# Altium PCB PS_Filter.PcbDoc
Units mm, origin at the board's own origin, x right, y up, seen from the top; angles counter-clockwise.
Board outline 140.01 x 305.01 mm, 2 copper layers (Top Layer, Bottom Layer), stack 1.371 mm thick; 64 components, 31 nets, 190 pads, 15 vias.
Unrouted connection lines stored in the file: 3.
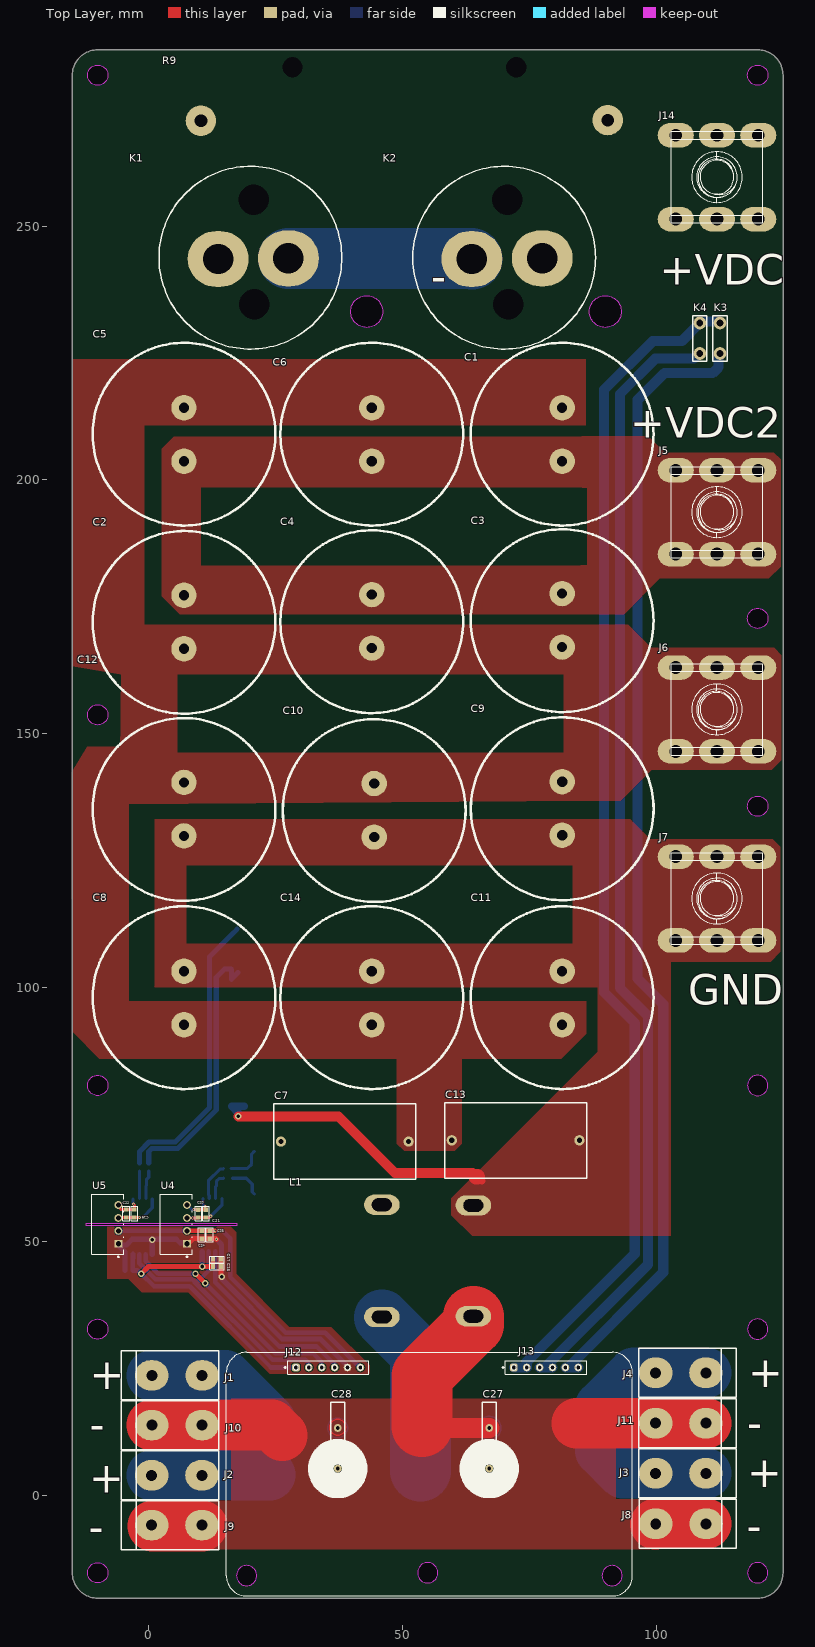
[diagram p0: Top Layer view]
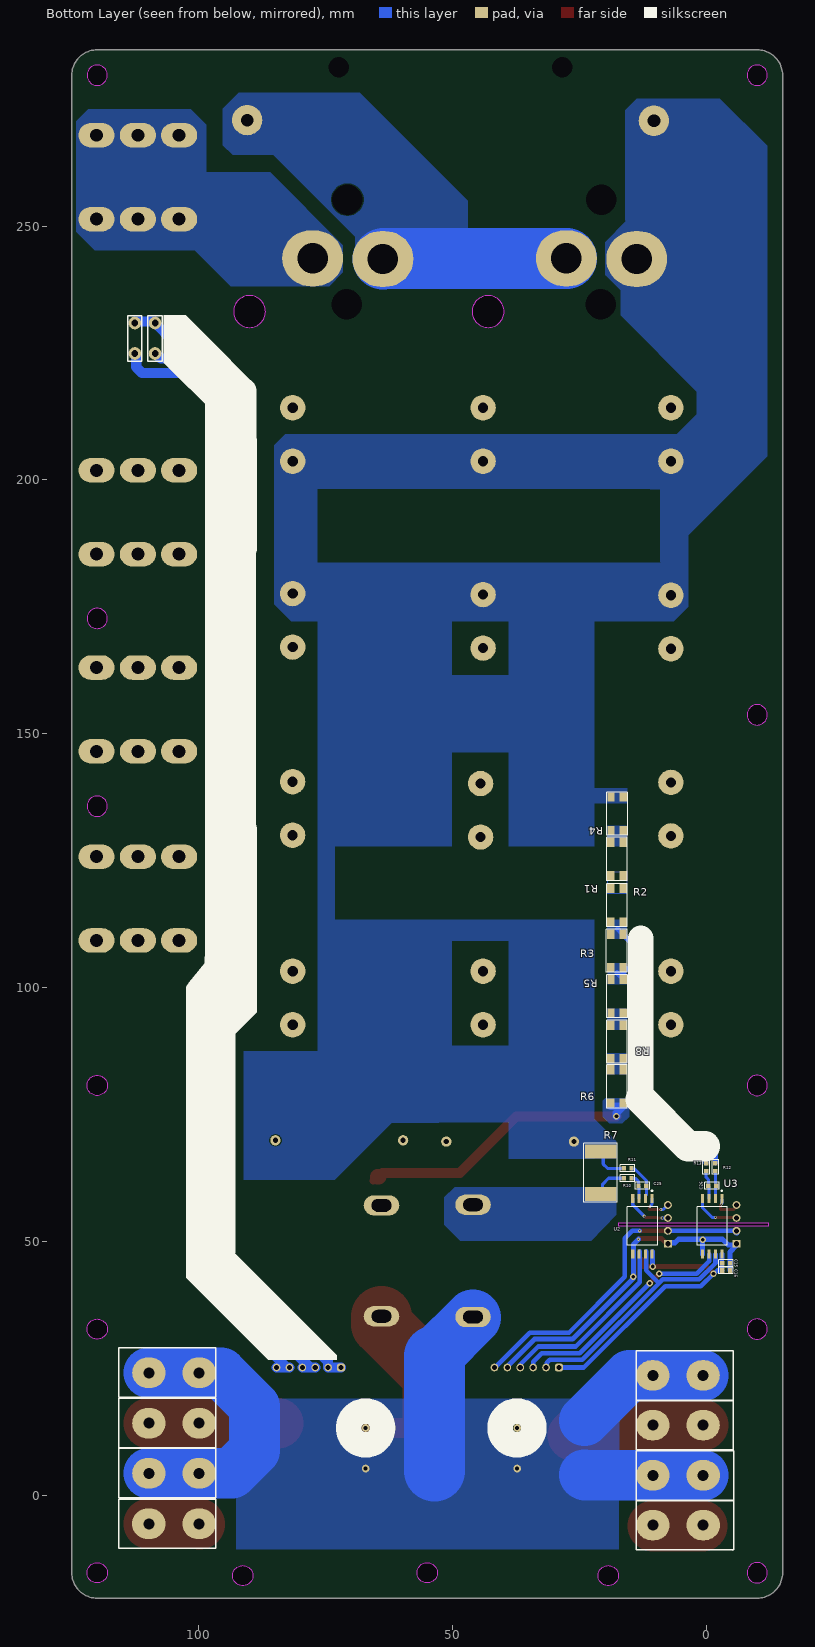
[diagram p1: Bottom Layer view, seen from below]
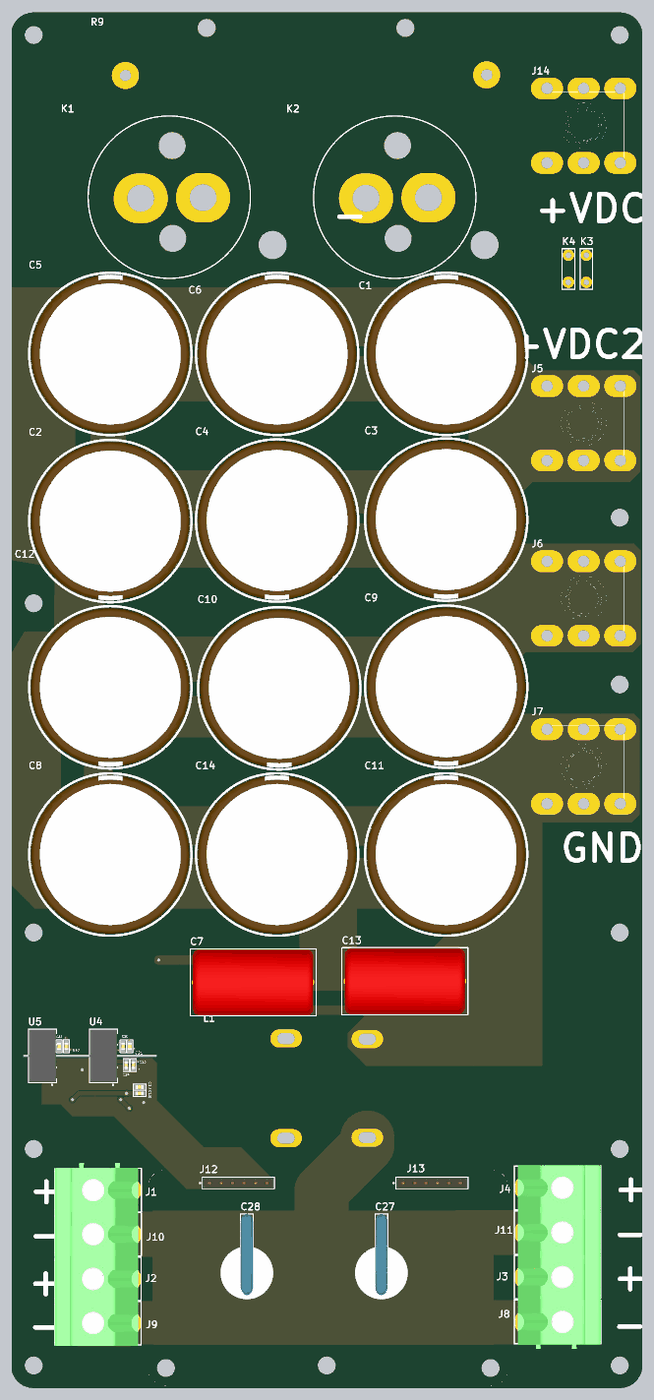
[diagram p2: 3D render of the assembled board from above, using the file's embedded part models]
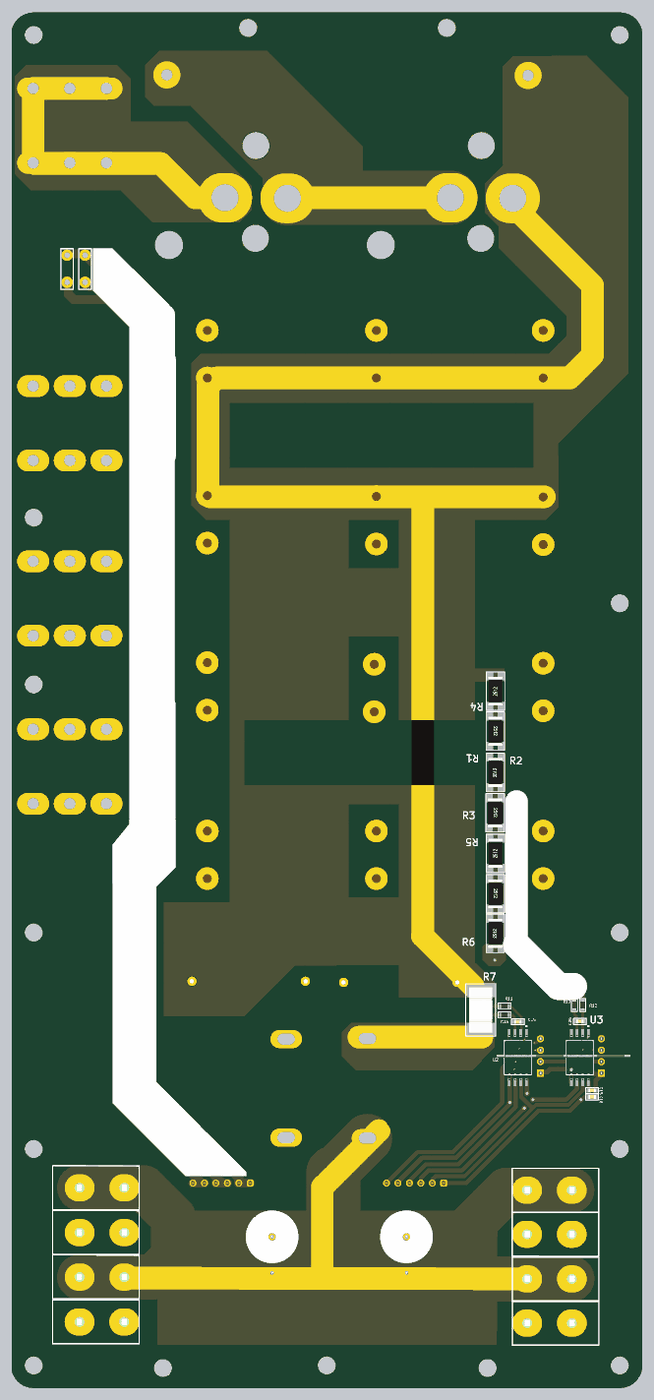
[diagram p3: 3D render of the assembled board from below, using the file's embedded part models]

## Layer stack, top to bottom
Top Solder: solder mask 0.0102, Solder Resist, Dk 3.5
Top Layer: signal copper 0.0356
Dielectric 1: dielectric 1.3, FR-4, Dk 4.8
Bottom Layer: signal copper 0.0356
Bottom Solder: solder mask 0.0102, Solder Resist, Dk 3.5

## Board outline
-9.994,-20.299 cw(c-9.994,-15.293) -15,-15.293 -15,279.707 cw(c-9.994,279.707) -9.994,284.714 120.006,284.714 cw(c120.006,279.707) 125.013,279.707 125.013,-15.293 cw(c120.006,-15.293) 120.006,-20.299
cut-out: 90,230 cw(c90,233.144) 86.856,233.144 cw(c90,233.144) 90,236.287 cw(c90,233.144) 93.144,233.144 cw(c90,233.144)
cut-out: 43,230 cw(c43,233.144) 39.856,233.144 cw(c43,233.144) 43,236.287 cw(c43,233.144) 46.144,233.144 cw(c43,233.144)
cut-out: 89.337,-15.856 ccw(c91.337,-15.856) 91.337,-17.856 ccw(c91.337,-15.856) 93.337,-15.856 ccw(c91.337,-15.856) 91.337,-13.856 ccw(c91.337,-15.856)
cut-out: 17.337,-15.856 ccw(c19.337,-15.856) 19.337,-17.856 ccw(c19.337,-15.856) 21.337,-15.856 ccw(c19.337,-15.856) 19.337,-13.856 ccw(c19.337,-15.856)
cut-out: -9.994,-17.293 cw(c-9.994,-15.293) -11.994,-15.293 cw(c-9.994,-15.293) -9.994,-13.293 cw(c-9.994,-15.293) -7.994,-15.293 cw(c-9.994,-15.293)
cut-out: 53.006,-15.293 ccw(c55.006,-15.293) 55.006,-17.293 ccw(c55.006,-15.293) 57.006,-15.293 ccw(c55.006,-15.293) 55.006,-13.293 ccw(c55.006,-15.293)
cut-out: 118.006,-15.293 ccw(c120.006,-15.293) 120.006,-17.293 ccw(c120.006,-15.293) 122.006,-15.293 ccw(c120.006,-15.293) 120.006,-13.293 ccw(c120.006,-15.293)
cut-out: -9.994,30.707 cw(c-9.994,32.707) -11.994,32.707 cw(c-9.994,32.707) -9.994,34.707 cw(c-9.994,32.707) -7.994,32.707 cw(c-9.994,32.707)
cut-out: 118.006,32.707 ccw(c120.006,32.707) 120.006,30.707 ccw(c120.006,32.707) 122.006,32.707 ccw(c120.006,32.707) 120.006,34.707 ccw(c120.006,32.707)
cut-out: 118.006,80.707 ccw(c120.006,80.707) 120.006,78.707 ccw(c120.006,80.707) 122.006,80.707 ccw(c120.006,80.707) 120.006,82.707 ccw(c120.006,80.707)
cut-out: 120.006,133.707 cw(c120.006,135.707) 118.006,135.707 cw(c120.006,135.707) 120.006,137.707 cw(c120.006,135.707) 122.006,135.707 cw(c120.006,135.707)
cut-out: -9.994,277.707 cw(c-9.994,279.707) -11.994,279.707 cw(c-9.994,279.707) -9.994,281.707 cw(c-9.994,279.707) -7.994,279.707 cw(c-9.994,279.707)
cut-out: 120.006,170.707 cw(c120.006,172.707) 118.006,172.707 cw(c120.006,172.707) 120.006,174.707 cw(c120.006,172.707) 122.006,172.707 cw(c120.006,172.707)
cut-out: 120.006,277.707 cw(c120.006,279.707) 118.006,279.707 cw(c120.006,279.707) 120.006,281.707 cw(c120.006,279.707) 122.006,279.707 cw(c120.006,279.707)
cut-out: -9.994,78.707 cw(c-9.994,80.707) -11.994,80.707 cw(c-9.994,80.707) -9.994,82.707 cw(c-9.994,80.707) -7.994,80.707 cw(c-9.994,80.707)
cut-out: -9.994,151.707 cw(c-9.994,153.707) -11.994,153.707 cw(c-9.994,153.707) -9.994,155.707 cw(c-9.994,153.707) -7.994,153.707 cw(c-9.994,153.707)
cut-out: -12.294,53.087 -12.294,53.574 17.368,53.574 17.368,53.087

## Design rules (kind name [scope] priority, off if disabled: settings)
Clearance HV [InNetClass('All Nets') vs InNetClass('HV')] p1: gap=0.2 ignorepadtopadclearanceinfootprint=TRUE except(0: Text-Text Text-Hole; 0.4: THPad-THPad THPad-Via THPad-Fill THPad-Poly THPad-Region THPad-Text THPad-Hole Via-Via Via-Fill Via-Poly Via-Region Via-Text Via-Hole; 0.5: SMDPad-SMDPad SMDPad-THPad SMDPad-Via SMDPad-Fill SMDPad-Poly SMDPad-Region SMDPad-Text SMDPad-Hole Fill-Fill Fill-Poly Fill-Region Fill-Text Fill-Hole Poly-Poly Poly-Region Poly-Text Poly-Hole Region-Region Region-Text Region-Hole)
Clearance Clearance_1 [All] p2: gap=0.18 ignorepadtopadclearanceinfootprint=TRUE
Clearance GND [InNet('GND')] p3: gap=0.4 ignorepadtopadclearanceinfootprint=TRUE except(0.3: Text-Text Text-Hole)
ComponentClearance [All] p1: gap=-2.254 collisioncheckmode=3 verticalgap=0.254 showdistances=FALSE
DiffPairsRouting [All] p1: maxlimit=0.254 minlimit=0.1 mostfreqgap=0.254 toplayer_minwidth=0.3 toplayer_maxwidth=2 toplayer_prefwidth=0.3 bottomlayer_minwidth=0.3 bottomlayer_maxwidth=2 bottomlayer_prefwidth=0.3 maxuncoupledlength=12.7
Height [All] p1: minheight=0 maxheight=100 prefheight=12.7
HoleSize [All] p1: absolutevalues=TRUE maxlimit=20 minlimit=0.025 maxpercent=80.000 minpercent=20.000
HoleToHoleClearance [All] p1: gap=0 allowstackedmicrovias=TRUE
LayerPairs [All] p1 off: enforce=TRUE
MinimumSolderMaskSliver [All] p1: minsoldermaskwidth=0.01
PlaneClearance [All] p1: clearance=0.4
PlaneConnect [All] p1: planeconnectstyle=Direct reliefexpansion=0.508 reliefentries=4 reliefconductorwidth=0.254 reliefairgap=0.254
PolygonConnect [All] p1: connectstyle=Direct reliefconductorwidth=0.254 reliefentries=4 polygonreliefangle="90 Angle" airgapwidth=0.254
RoutingCorners [All] p1: cornerstyle=45-Degree minsetback=0.2 maxsetback=0.2
RoutingVias [All] p1: holewidth=0.4 width=0.8 viastyle="Through Hole" minholewidth=0.254 minwidth=0.5 maxholewidth=0.75 maxwidth=1.5
ShortCircuit [All] p1: allowed=TRUE
SilkToSilkClearance [All] p1 off: silktosilkclearance=0.01
SilkToSolderMaskClearance [All] p1: minsilkscreentomaskgap=0 clearancetoexposedcopper=FALSE
SolderMaskExpansion [All] p1: expansion=0 istentingtop=FALSE
SupplyNets "Schematic Supply Nets_3" [InNet('GND_1')] p1: voltage=0.000
SupplyNets "Schematic Supply Nets_8" [InNet('GND_2')] p2: voltage=0.000
SupplyNets "Schematic Supply Nets_7" [InNet('3.3V_2')] p3: voltage=0.000
SupplyNets "Schematic Supply Nets_6" [InNet('3.3V_1')] p4: voltage=0.000
SupplyNets "Schematic Supply Nets_5" [InNet('+5')] p5: voltage=0.000
SupplyNets "Schematic Supply Nets_1" [InNet('VCC')] p6: voltage=0.000
SupplyNets "Schematic Supply Nets_4" [InNet('V_HV')] p7: voltage=0.000
SupplyNets "Schematic Supply Nets_2" [InNet('GND_HV')] p8: voltage=0.000
SupplyNets "Schematic Supply Nets" [InNet('GND')] p9: voltage=0.000
UnRoutedNet [All] p1: checkbadconnections=TRUE
Width [All] p1: maxlimit=15 minlimit=0.254 preferedwidth=1 minimp=50.000000 maximp=50.000000 favimp=50.000000
16 further rules are at their usual default settings.

## Components (designator, comment, footprint, x,y, rotation, side; value= is the part's Value field where it differs from the comment)
C1 "550V_470uF" 500V_470uF 81.5,209 r90 top locked
C2 "550V_470uF" 500V_470uF 7,171.932 r270 top locked
C3 "550V_470uF" 500V_470uF 81.5,172.257 r270 top
C4 "550V_470uF" 500V_470uF 44,172.057 r270 top locked
C5 "550V_470uF" 500V_470uF 7,209 r90 top locked
C6 "550V_470uF" 500V_470uF 44,209 r90 top locked
C7 "4,7uF_630V" CAP_4.7uF_630V 38.675,69.65 r180 top
C8 "550V_470uF" 500V_470uF 7,98 r90 top locked
C9 "550V_470uF" 500V_470uF 81.506,135.207 r270 top
C10 "550V_470uF" 500V_470uF 44.475,134.85 r270 top
C11 "550V_470uF" 500V_470uF 81.5,98 r90 top locked
C12 "550V_470uF" 500V_470uF 7,135.075 r270 top locked
C13 "4,7uF_630V" CAP_4.7uF_630V 72.325,69.9 r180 top
C14 "550V_470uF" 500V_470uF 44,98 r90 top locked
C15 "0.1uF" CAP-0603 -3.861,45.676 r180 bottom
C16 "2.2uF" CAP-0603 -3.861,44.247 r180 bottom
C17 "0.1uF" CAP-0603 13.487,46.431 r0 top
C18 "2.2uF" CAP-0603 13.487,45.034 r0 top
C19 "0.1uF" CAP-0603 -2.755,55.485 r270 top
C20 "0.1uF" CAP-0603 11.325,55.475 r270 top
C21 "10uF" CAP-0603 9.85,55.475 r270 top
C22 "10uF" CAP-0603 -4.375,55.485 r270 top
C23 "2.2uF" CAP-0603 12.112,51.293 r270 top
C24 "0.1uF" CAP-0603 10.525,51.293 r270 top
C25 "2.2nF" CAP-0603 12.612,60.934 r180 bottom
C26 "1nF" CAP-0603 -1.139,60.981 r0 bottom
C27 "47nF_2KV" 47nF_2kV 67.132,9.296 r270 top
C28 "47nF_2KV" 47nF_2kV 37.287,9.296 r270 top
J1 "KF136HT-10.16" Conn_MEIGAN_MG136HT 3.2,23.575 r270 top
J2 "KF136HT-10.16" Conn_MEIGAN_MG136HT 3.175,3.9 r270 top
J3 "KF136HT-10.16" Conn_MEIGAN_MG136HT 107.279,4.301 r90 top
J4 "KF136HT-10.16" Conn_MEIGAN_MG136HT 107.279,24.101 r90 top
J5 "18 * 18MM 180A PCB" "M8 Conn" 112,194 r0 top locked
J6 "18 * 18MM 180A PCB" "M8 Conn" 112,155.15 r0 top
J7 "18 * 18MM 180A PCB" "M8 Conn" 112,117.9 r0 top
J8 "KF136HT-10.16" Conn_MEIGAN_MG136HT 107.304,-5.649 r90 top
J9 "KF136HT-10.16" Conn_MEIGAN_MG136HT 3.175,-5.9 r270 top
J10 "KF136HT-10.16" Conn_MEIGAN_MG136HT 3.2,13.8 r270 top
J11 "KF136HT-10.16" Conn_MEIGAN_MG136HT 107.279,14.176 r90 top
J12 "61300611821" 61300611821 35.404,25.144 r0 top
J13 "61300611821" 61300611821 78.328,25.144 r0 top
J14 "18 * 18MM 180A PCB" "M8 Conn" 112,260 r0 top locked
K1 "SEV30ADXL" Relay_1000VDC_30A 15,243 r270 top locked
K2 "SEV30ADXL" Relay_1000VDC_30A 65,243 r270 top locked
K3 "Relay coil wire" Relay_Coil 112.598,227.889 r270 top
K4 "Relay coil wire" Relay_Coil 108.61,227.889 r270 top
L1 "Drossel" T47x27x15 54.991,38.151 r0 top
R1 "301K" RES-2512 17.625,125.325 r270 bottom
R2 "301K" RES-2512 17.625,116.2 r90 bottom
R3 "2.1K" RES-2512 17.65,107.225 r270 bottom
R4 "301K" RES-2512 17.575,134.225 r90 bottom
R5 "301K" RES-2512 17.575,98.275 r90 bottom
R6 "301K" RES-2512 17.625,80.525 r90 bottom
R7 "3.5mOhm" RES-3921 20.85,63.525 r90 bottom
R8 "301K" RES-2512 17.6,89.3 r270 bottom
R9 "100" RES_100W_Aluminium 50.47,270.866 r0 top
R10 "33 Omh" RES-0603 15.537,62.425 r180 bottom
R11 "33 Omh" RES-0603 15.537,64.375 r180 bottom
R12 "33 Omh" RES-0603 -1.774,64.618 r90 bottom
R13 "33 Omh" RES-0603 0.061,64.618 r90 bottom
U2 "AMC1306M25" FP-DWV0008A-MFG 12.612,52.978 r270 bottom
U3 "AMC1336-Q1" FP-DWV0008A-MFG -1.139,52.978 r270 bottom
U4 "B0505S-1W" B0505S-1W 5.495,53.339 r90 top locked
U5 "B0505S-1W" B0505S-1W -8.02,53.339 r90 top locked

## Footprints (in the part's own frame and the unit in brackets; to place one, negate y for a bottom-side part, rotate by r counter-clockwise, add the part's x,y. Pads: shape width x height; smd on the part's side, far side on the other; paste and mask are expansions set on the pad)
47nF_2kV [mil]
  round 60 hole 30: 1(-155,0) 2(160,0)
  silkscreen extent -355,-55 360,55, body extent -357,-54 357,54, height 829
500V_470uF [mm]
  round 5 hole 2: 1(-5.334,0) 2(5.207,0)
  silkscreen extent -18,-18 18,18, body extent -17.6,-17.6 17.61,17.61, height 59.97
61300611821 [mm] "Socket Header, Pitch 2.54 mm, THT, Vertical, single row, 6p"
  rrect50% 1.52x1.52 hole 1.02: 1(-6.35,0)
  round 1.52 hole 1.02: 2(-3.81,0) 3(-1.27,0) 4(1.27,0) 5(3.81,0) 6(6.35,0)
  silkscreen extent -8.6,-1.35 8,1.35, body extent -7.87,-1.25 7.87,1.25, height 8.55
B0505S-1W [mm]
  rect 1.55x1.55 hole 1 paste-2539.97 mask+0: 1(-3.81,-2.1)
  round 1.55 hole 1 paste-2539.97 mask+0: 2(-1.27,-2.1) 3(1.27,-2.1) 4(3.81,-2.1)
  silkscreen extent -6.52,-3.13 5.92,3.13, body extent -6.02,-3.22 6.02,3.22, height 0.25
CAP-0603 [mm]
  rect 0.85x0.9 smd: 1(-0.775,0) 2(0.775,0)
  silkscreen extent -1.43,-0.67 1.43,0.67, body extent -0.8,-0.4 0.8,0.4, height 0.8
CAP_4.7uF_630V [mil]
  round 80 hole 40: 1(-495,0) 2(495,0)
  silkscreen extent -550,-293 550,293, body extent -527,-289 527,289, height 1242
Conn_MEIGAN_MG136HT [mm]
  oval 6x6.6 hole 2.159: 1(0,7.366) 1(0,-2.54)
  silkscreen extent -4.83,-8.51 4.83,10.67, body extent -6,-8.55 5,9.95, height 30.95
FP-DWV0008A-MFG [mm]
  rect 1.8x0.6 smd paste+0 mask+0: 1(-5.45,1.905) 2(-5.45,0.635) 3(-5.45,-0.635) 4(-5.45,-1.905) 5(5.45,-1.905) 6(5.45,-0.635) 7(5.45,0.635) 8(5.45,1.905)
  silkscreen extent -7.1,-2.98 3.8,2.98, body extent -5.75,-2.93 5.75,2.93, height 2.8
"M8 Conn" [mil] "M8 Conn"
  oval 280x190 hole 100: 1(-320,-340) 1(-320,310) 1(0,-340) 1(0,310) 1(320,-340) 1(320,310)
  silkscreen extent -355,-369 354,340, body extent -355,-369 354,340, height 500
Relay_1000VDC_30A [mm] "Relay_1000VDC_30A"
  round 4 hole 6: 0(-12.192,5.715) 0(8.382,5.842)
  oval 11x12 hole 6: 1(-0.635,12.573) 2(-0.508,-1.27)
  silkscreen extent -18.76,-12.92 17.24,23.08, body extent -17.24,-19.09 16.26,30.52, height 52
Relay_Coil [mm]
  round 2.5 hole 1.3: 3(-3,0) 4(3,0)
  silkscreen extent -4.44,-1.4 4.57,1.4
RES-0603 [mm]
  rect 0.85x0.9 smd: 1(-0.775,0) 2(0.775,0)
  silkscreen extent -1.43,-0.67 1.43,0.67, body extent -0.85,-0.45 0.85,0.45, height 0.55
RES-2512 [mm]
  rect 1.8x1.45 smd: 1(-3.275,-1.225) 1(-3.275,1.225) 2(3.275,-1.225) 2(3.275,1.225)
  silkscreen extent -4.28,-2.05 4.25,2.05, body extent -3.2,-1.6 3.2,1.6, height 0.6
RES-3921 [mm]
  rect 2.75x6.2 smd: 1(-4.2,0) 2(4.2,0)
  silkscreen extent -5.8,-3.3 5.8,3.3, body extent -5,-2.6 5,2.6, height 0.83
RES_100W_Aluminium [mm]
  round 3 hole 4: 0(-22.098,10.414) 0(21.971,10.414)
  round 6 hole 2.5: 1(-40.132,-0.127) 2(40.005,0)
  body extent -43.07,-7.58 42.93,13.42, height 15.36
T47x27x15 [mm] "T47x27x15"
  oval 7x4 hole 2.5 slot 3.9 at 0 deg: 1(-9.017,19.05) 2(-9.017,-3.048) 3(9.017,18.923) 4(9.017,-2.921)
  body extent -27.5,-7.07 27.31,22.07, height 50.02

## Part data
C1 C2 C3 C4 C5 C6 C8 C9 C10 C11 C12 C14: library part CAP_POL_LOW_IMP
C7 C13 C15 C16 C17 C18 C19 C20 C21 C22 C23 C24 C25 C26: library part CAP-NON-POLAR
C27 C28: library part CAP-V
J1 J2 J3 J4 J8 J9 J10 J11: library part Connector_MEIGAN_MG136HT
J5 J6 J7 J14: library part Klema_15_A, "18 * 18MM 180A PCB High Current Solder Terminal Copper Terminal Fastener M8 Nut"
J12 J13: "WR-PHD Socket Header, THT, Vertical, pitch 2.54mm, 1 Row, 6P", Contact Resistance=20mOhm, Manufacturer="Wurth Elektronik", Operating Temperature Max=125°C, Operating Temperature Min=-40°C, Rated Current=3A, Withstanding Voltage=500V, Working Voltage=250V, Category="Board-to-Board Connectors", ComponentLink1Description="Website Link", ComponentLink1URL=https://www.we-online.com/redexpert/article/61300611821?ad, ComponentLink2Description="Datasheet Link", ComponentLink2URL=https://www.we-online.com/redexpert/spec/61300611821?ad, Gender="Socket Header", Manufacturer Part Number=61300611821, Match Code=WR-PHD, Mount="Through Hole", Number of Pins=6, Number of Rows=1, Orientation=Vertical, Packaging=Tray, Pitch=2.54mm
K1 K2: library part Relay, "5-1000V 30A DC Contactor Power Relay SEV30ADXL Coil 12V"
K3 K4: library part Coil_relay
L1: library part Drossel_Synphaze
R1 R2 R4 R5 R6 R8: library part RES-CONST, "301K   0.1%"
R3: library part RES-CONST, "2.1K   0.1%"
R7: library part RES-CONST, "3.5mOhm 1%  3920"
R9: library part RES-CONST, "100W RX24 Aluminum Power Metal Shell Case Wirewound Resistor 100Omh"
R10 R11 R12 R13: library part RES-CONST
U3: library part AMC1336

## Via types
v1: diameter 0.6, hole 0.3, Top Layer to Bottom Layer, tented both sides, 8 vias
v2: diameter 1.27, hole 0.711, Top Layer to Bottom Layer, tented both sides, 7 vias

## Nets (pads, with @x,y where several pads share a name; then routed paths per layer and width w, separated by ;. In a path a pad name is that pad's centre, name@x,y a point inside that pad or via, vN(x,y) a via of type N, cw(c..) or ccw(c..) an arc to the next point about the centre after c; other vN are vias at no path point)
3.3V_1: C19.1 C22.1 U3.1 U5.4 | length 5.7
  Top Layer w0.6: U5.4@-5.975,56.835 -5.4,56.26 C22.1 C19.1 -2.755,57.17 v1(-2.93,57.345)
  Bottom Layer w0.6: U3.1@-3.055,58.35 -3.055,57.47 v1(-2.93,57.345)
3.3V_2: C20.1 C21.1 U2.1 U4.4 | length 6.5
  Top Layer w0.6: v1(8.956,56.25) C21.1 C20.1 11.2,56.375 11.175,56.375 11.175,56.856 v1(11.131,56.9)
  Bottom Layer w0.6: U4.4@7.65,57.135 8.535,56.25 v1(8.956,56.25) ; U2.1 10.707,57.325 v1(11.131,56.9)
+5: C23.1 C24.1 J12.6 U4.2 U5.2 | length 63.8
  Top Layer w0.9: U4.2@7.595,51.841 7.822,52.068 C24.1 C23.1 13.122,52.068 v1(13.135,52.055)
  Bottom Layer w0.9: U5.2@-6.05,51.555 -5.874,51.555 -5.374,52.055 U4.2@7.65,52.055 ; U4.2@7.595,51.841 U4.2@7.719,51.966 ; v1(13.135,52.055) 14.595,52.055 16.078,50.571 16.078,43.002 27.076,32.004 34.817,32.004 J12.6@41.625,25.196
GND: C15.2 C16.2 C17.2 C18.2 C23.2 C24.2 J12.5 U2.5 U3.5 U4.1 U5.1 | length 73
  Top Layer w1: U4.1@7.595,49.301 8.812,50.518 C24.2 C23.2 13.275,50.518 v1(13.389,50.405) ; C17.2 C18.2 14.262,43.218 14.405,43.075 v2(14.405,43.002)
  Bottom Layer w1: U5.1@-5.975,49.215 -4.636,47.876 C15.2 C16.2 ; U5.1@-5.775,49.29 -4.3,49.29 -3.185,50.405 v2@0.625,50.405 ; U3.5@0.755,47.45 v2(0.755,50.275) v2@0.625,50.405 ; U4.1@7.65,49.515 7.447,49.718 6.182,49.718 5.495,50.405 v2@0.625,50.405 ; v1(13.389,50.405) 14.405,49.389 v2(14.405,43.002) 14.405,42.694 26.365,30.734 33.88,30.734 38.954,25.66 38.954,25.544 39.214,25.284 J12.5
GND_1: C19.2 C22.2 U3.4 U5.3 | length 9.4
  Top Layer w0.6: U5.3@-5.975,54.295 -5.56,54.71 C22.2 C19.2 -1.788,54.71 v1(-1.785,54.707)
  Bottom Layer w0.6: v1@-1.788,54.707 v1(-1.785,54.707) -1.139,54.707 0.755,56.601 U3.4@0.755,58.35
GND_2: C20.2 C21.2 U2.4 U4.3 | length 9.2
  Top Layer w0.6: v1(8.72,54.595) 9.745,54.595 C21.2 C20.2 12.01,54.7 v1(12.277,54.967)
  Bottom Layer w0.6: U4.3@7.65,54.595 v1(8.72,54.595) ; v1(12.277,54.967) 14.517,57.207 U2.4
GND_HV: C8.2 C9.2 C10.2 C11.2 C12.2 C13.1 C14.2 J7.1 L1.3 R6.1 | length 58.2
  Top Layer w1.5: 64.8,62.725 65.625,61.9
  Top Layer w2: v2(17.725,74.6) 37.45,74.6 48.575,63.475 63.796,63.475 64.545,62.725
  Top Layer w3: 64.545,62.725 64.8,62.725
  Bottom Layer w1.5: v2(17.725,74.6) 17.725,75.275 16.375,76.625 R6.1@18.825,76.625
NetC1_2: C1.2 C2.2 C3.2 C4.2 C5.2 C6.2 C7.1 C8.1 C9.1 C10.1 C11.1 C12.1 C13.2 C14.1 J6.1 | length 0.3
  Top Layer w4: C14.1@43.729,92.666 C14.1
NetC25_1: C25.1 R10.2 U2.3 | length 5.1
  Bottom Layer w0.6: U2.3 13.247,60.808 13.378,60.939 13.378,61.827 13.895,62.344 14.68,62.344 R10.2
NetC25_2: C25.2 R11.2 U2.2 | length 7.6
  Bottom Layer w0.6: U2.2 11.977,59.028 11.837,59.168 C25.2 11.79,60.981 11.79,61.929 14.087,64.225 14.637,64.225 14.762,64.35 R11.2
NetC26_1: C26.1 R12.1 U3.2 | length 5.4
  Bottom Layer w0.6: U3.2 R12.1
NetC26_2: C26.2 R13.1 U3.3 | length 5.7
  Bottom Layer w0.6: U3.3 -0.504,60.841 C26.2 -0.406,61.023 -0.406,62.128 0.061,62.596 R13.1
NetC27_1: C27.1 C28.1 J8.1 J9.1 J10.1 J11.1 L1.4 | length 121.3
  Top Layer w0.254: 38.872,13.36 ccw(c37.287,13.36) 38.872,13.36
  Top Layer w2: J9.1@0.635,-5.9 J9.1@0.835,-6.1
  Top Layer w4: 53.848,13.513 54.153,13.208 67.107,13.208 C27.1
  Top Layer w10: J10.1@0.66,13.8 10.566,13.8 24.275,13.8 26.35,11.725 ; J9.1@0.835,-6.1 J9.1@10.541,-6.1 ; 84.379,14.176 99.913,14.176 J11.1@109.819,14.176 ; J8.1@99.838,-5.749 99.938,-5.649 J8.1@109.844,-5.649
  Top Layer w12: 53.848,13.513 53.848,23.444 64.008,33.604 L1.4
NetC27_2: C27.2 C28.2 J1.1 J2.1 J3.1 J4.1 L1.2 | length 166
  Bottom Layer w0.254: 39.247,13.233 ccw(c37.287,13.233) 39.247,13.233 ; 69.431,13.233 ccw(c67.132,13.233) 69.431,13.233
  Bottom Layer w10: J2.1@0.635,3.9 10.541,3.9 23.875,3.9 24,4.025 ; J1.1@0.66,23.575 10.566,23.575 15.15,23.575 24,14.725 ; 93.18,4.648 93.527,4.301 ; J3.1@109.819,4.301 99.913,4.301 93.527,4.301 ; J4.1@109.819,24.101 99.913,24.101 95.626,24.101 89.012,17.487 89.012,8.817 93.527,4.301
  Bottom Layer w11: L1.2@45.999,34.976 53.569,27.407
  Bottom Layer w12: 53.569,4.716 53.569,27.407
NetJ12_2: J12.2 U2.7 U3.7 | length 51.7
  Bottom Layer w0.9: U3.7@-1.785,47.45 -1.785,45.676 1.397,42.494 8.611,42.494 9.353,41.752 ; U2.7@11.865,48.025 11.865,44.264 9.353,41.752 ; J12.2@31.61,24.857 31.476,24.991 31.476,26.077 30.882,26.67 24.435,26.67 9.353,41.752
NetJ12_3: J12.3 U3.6 | length 45.3
  Top Layer w0.9: v2(9.275,43.632) 9.285,43.632 11.166,41.752 v2(11.176,41.752)
  Bottom Layer w0.9: U3.6@-0.515,47.45 -0.515,46.083 1.935,43.632 v2(9.275,43.632) ; v2(11.176,41.752) 24.988,27.94 32.41,27.94 34.079,26.272 34.079,25.199 J12.3
NetJ12_4: J12.4 U2.6 | length 37.1
  Bottom Layer w0.9: U2.6@13.135,48.025 13.135,41.907 25.756,29.286 33.122,29.286 36.674,25.733 J12.4 J12.4@36.674,25.015
NetJ13_1: J13.1 J13.2 K3.3 K4.3 | length 234.8
  Bottom Layer w2: J13.1 J13.2 74.518,26.283 95.783,47.549 95.783,93.015 89.738,99.06 89.738,217.754 99.314,227.33 105.052,227.33 K4.3 ; K4.3@108.61,231.209 K3.3@112.609,231.209
NetJ13_3: J13.3 J13.4 K4.4 | length 223.7
  Bottom Layer w2: J13.3 J13.4 ; 78.328,25.394 98.425,45.491 98.425,94.336 92.888,99.873 92.888,216.916 99.847,223.876 107.462,223.876 108.475,224.889 K4.4
NetJ13_5: J13.5 J13.6 K3.4 | length 225
  Bottom Layer w2: J13.6 J13.5 82.675,25.144 101.422,43.891 101.422,96.698 96.368,101.752 96.368,215.773 101.625,221.031 111.147,221.031 112.319,222.202 112.319,224.474 112.598,224.754 K3.4
NetJ14_1: J14.1 K2.1
NetK1_1: K1.1 K2.2 R9.2 | length 36.2
  Bottom Layer w12: K1.1 63.603,243.635 K2.2
NetL1_1: L1.1 R7.1 R10.1 | length 6.4
  Bottom Layer w0.6: R10.1@16.612,62.425 19.275,62.425 20.451,61.249 20.451,59.724 R7.1
NetR1_1: R1.1 R4.1
NetR1_2: R1.2 R2.2
NetR2_1: R2.1 R3.1 R12.2 | length 57.1
  Bottom Layer w1: R12.2 -1.774,67.67 0.127,69.571 5.296,69.571 12.065,76.34 12.065,106.094 16.425,110.454 17.471,111.5
NetR3_2: R3.2 R5.2 R13.2 | length 52.6
  Bottom Layer w1: R13.2 0.061,67.715 0.647,68.301 5.791,68.301 13.36,75.87 13.36,101.975 15.007,103.622 16.278,103.622 R3.2@16.35,103.55 ; R5.2@16.35,101.55 R3.2@16.35,103.465 ; R5.2@16.35,101.675 17.65,102.975
NetR5_1: R5.1 R8.1
NetR6_2: R6.2 R8.2
V_HV: C1.1 C2.1 C3.1 C4.1 C5.1 C6.1 C7.2 J5.1 K1.2 R4.2 R7.2 R9.1 R11.1 | length 7.1
  Bottom Layer w0.6: R11.1 19.5,64.375 20.325,65.2 20.325,67.2 R7.2
VCC: C15.1 C16.1 C17.1 C18.1 J12.1 U2.8 U3.8 | length 62.3
  Top Layer w1: v2(-1.392,43.632) 0.01,45.034 v2(10.595,45.034) C18.1 C17.1@12.712,46.406
  Bottom Layer w0.9: C16.1 -2.107,44.247 -1.492,43.632 v2(-1.392,43.632) 1.092,41.148 8.128,41.148 24.132,25.144 J12.1 ; C16.1@-3.055,44.267 U3.8@-3.055,46.767
  Bottom Layer w1: U3.8@-3.055,46.767 U3.8@-3.055,47.45 ; v2(10.595,45.034) U2.8@10.595,48.025
pads on no net: K1.0 K2.0 R9.0

## Polygon pours and split planes (outlines as drawn)
GND on Top Layer "GND_L01_P045" (solid, pour order 45): -8.159,53.188 15.951,53.188 17.323,51.816 17.323,43.485 17.348,43.485 27.711,33.122 36.017,33.122 43.597,25.542 43.597,23.794 23.911,23.892 7.849,39.954 -1.346,39.954 -4.013,42.621 -8.159,42.621
NetC27_1 on Top Layer "NETC27_1_L01_P043" (solid, pour order 43): 5.715,-1.074 23.488,-1.074 23.495,-1.067 33.122,-1.067 33.122,-10.135 32.588,-10.668 5.741,-10.668
NetC27_1 on Top Layer "NETC27_1_L01_P042" (solid, pour order 42): 98.992,-10.475 98.799,-10.668 89.408,-10.668 89.408,-1.016 89.357,-0.965 89.499,-0.823 103.083,-0.823 103.858,-1.598 103.858,-10.475
NetC27_1 on Top Layer "NETC27_1_L01_P024" (solid, pour order 24): 16.318,18.999 92.025,18.999 92.025,-10.7 16.297,-10.7
GND_HV on Top Layer "GND_HV_L01_P001" (solid, pour order 1): 102.845,51.076 102.845,107.387 92.662,107.387 88.4,103.125 88.55,102.975 88.55,87.3 59.69,58.44 59.69,55.143 63.758,51.076
NetC1_2 on Top Layer "NETC1_2_L01_P002" (solid, pour order 2): -5.238,171.45 87.709,171.45 87.709,136.774 -5.641,136.053
GND_HV on Top Layer "GND_HV_L01_P004" (solid, pour order 4): 1.2,133.125 91.45,133.125 91.45,100 0.95,100 1.2,100.25
NetC1_2 on Top Layer "NETC1_2_L01_P005" (solid, pour order 5): 86.182,223.774 86.182,210.726 -13.952,210.726 -15,211.774 -15,223.774
NetC1_2 on Top Layer "NETC1_2_L01_P006" (solid, pour order 6): -12.33,214.65 -3.775,214.65 -0.8,211.675 -0.8,160.925 -15,163.29 -15,212.762
NetC1_2 on Top Layer "NETC1_2_L01_P007" (solid, pour order 7): 86.27,90.929 81.32,85.979 -9.652,85.979 -14.931,91.258 -14.931,97.286 86.27,97.286
NetC1_2 on Top Layer "NETC1_2_L01_P008" (solid, pour order 8): -15.096,142.365 -12.045,147.45 -3.9,147.45 -3.9,95.225 -6.725,92.4 -15,92.4
V_HV on Top Layer "V_HV_L01_P009" (solid, pour order 9): 2.65,206.15 5.025,208.525 86.42,208.525 88.138,206.807 88.138,176.149 85.539,173.55 6.175,173.55 2.65,177.075
NetC1_2 on Top Layer "NETC1_2_L01_P014" (solid, pour order 14): 38.708,96.641 38.758,96.691 61.683,96.691 61.683,69.191 60.308,67.816 50.358,67.816 48.92,69.253 48.92,87.516 42.708,87.516 38.883,91.341
NetC1_2 on Top Layer "NETC1_2_L01_P015" (solid, pour order 15): 86.2,171.45 94.506,171.45 99.031,166.925 123.25,166.925 124.7,165.475 124.7,144.725 122.825,142.85 99.05,142.85 99.05,142.775 93.049,136.774 86.2,136.774
GND_HV on Top Layer "GND_HV_L01_P017" (solid, pour order 17): 85.979,133.136 94.869,133.136 98.81,129.196 123.029,129.196 124.479,127.746 124.479,106.996 122.604,105.121 98.829,105.121 98.829,105.046 93.87,100.086 85.979,100.086
V_HV on Top Layer "V_HV_L01_P041" (solid, pour order 41): 85.319,208.525 85.353,208.559 98.487,208.559 101.713,205.334 123.215,205.334 124.511,204.038 124.511,182.905 122.225,180.619 100.66,180.619 100.66,180.492 93.718,173.55 85.09,173.55
NetC27_2 on Bottom Layer "NETC27_2_L02_P023" (solid, pour order 23): 17.129,18.999 92.625,18.999 92.625,-10.7 17.282,-10.7
NetL1_1 on Bottom Layer "NETL1_1_L02_P021" (solid, pour order 21): 17.75,60.7 49.612,60.7 51.664,58.649 51.664,53.264 48.514,50.114 22.696,50.114 17.75,55.275
V_HV on Bottom Layer "V_HV_L02_P010" (solid, pour order 10): 3.717,209.025 82.923,209.025 85.09,206.858 85.09,175.489 81.751,172.15 6.463,172.15 3.589,175.023
V_HV on Bottom Layer "V_HV_L02_P011" (solid, pour order 11): 22.073,182.275 38.975,182.275 38.975,66.3 22.073,66.3
V_HV on Bottom Layer "V_HV_L02_P012" (solid, pour order 12): 50.475,183.65 69.825,183.65 76.53,176.945 76.53,87.18 62.75,73.4 52.75,73.4 50.125,76.025 50.125,183.3
V_HV on Bottom Layer "V_HV_L02_P022" (solid, pour order 22): 15.588,139.25 23.212,139.25 23.212,136.825 22.637,136.25 15.538,136.25
NetR1_1 on Bottom Layer "NETR1_1_L02_P025" (solid, pour order 25): 15.625,131.85 19.525,131.85 19.525,127.75 19.575,127.7 15.675,127.7
NetR1_2 on Bottom Layer "NETR1_2_L02_P026" (solid, pour order 26): 15.625,122.725 19.525,122.725 19.525,118.625 19.575,118.575 15.675,118.575
NetR2_1 on Bottom Layer "NETR2_1_L02_P027" (solid, pour order 27): 15.65,113.75 19.55,113.75 19.55,109.65 19.6,109.6 15.7,109.6
NetR3_2 on Bottom Layer "NETR3_2_L02_P028" (solid, pour order 28): 15.575,104.8 19.475,104.8 19.475,100.7 19.525,100.65 15.625,100.65
NetR5_1 on Bottom Layer "NETR5_1_L02_P029" (solid, pour order 29): 15.6,95.825 19.5,95.825 19.5,91.725 19.55,91.675 15.65,91.675
NetR6_2 on Bottom Layer "NETR6_2_L02_P030" (solid, pour order 30): 15.625,87.05 19.525,87.05 19.525,82.95 19.575,82.9 15.675,82.9
V_HV on Bottom Layer "V_HV_L02_P032" (solid, pour order 32): 35.425,161.575 35.525,161.475 53.425,161.475 53.425,146.55 53.625,146.35 35.075,146.35
V_HV on Bottom Layer "V_HV_L02_P033" (solid, pour order 33): 35.575,124.388 35.675,124.288 53.575,124.288 53.575,109.362 53.775,109.162 35.225,109.162
V_HV on Bottom Layer "V_HV_L02_P034" (solid, pour order 34): 36.125,88.663 36.225,88.563 54.125,88.563 54.125,73.638 54.325,73.438 35.775,73.438
V_HV on Bottom Layer "V_HV_L02_P035" (solid, pour order 35): 17.75,66.35 17.75,69.75 21.925,73.925 24.15,73.925 24.15,69.325 24.05,69.225 24.15,69.125 24.15,66.3
V_HV on Bottom Layer "V_HV_L02_P036" (solid, pour order 36): 70.178,87.427 91.161,87.427 91.161,62.128 73.254,62.128 55.878,79.504
V_HV on Bottom Layer "V_HV_L02_P037" (solid, pour order 37): 5.08,275.107 5.105,275.082 13.741,275.082 16.027,272.796 16.027,251.104 15.85,250.927 19.939,246.837 19.939,240.335 19.812,240.335 16.866,237.388 16.866,232.385 1.88,217.399 1.88,212.96 11.074,203.765 11.074,183.769 8.915,183.769 -11.938,204.622 -11.938,265.786 -2.616,275.107
NetK1_1 on Bottom Layer "NETK1_1_L02_P039" (solid, pour order 39): 47.037,254.936 68.326,276.225 92.126,276.225 95.275,273.075 95.275,265.938 93.345,264.008 85.293,264.008 69.215,247.929 69.215,242.646 65.024,238.455 46.958,238.455
NetJ14_1 on Bottom Layer "NETJ14_1_L02_P040" (solid, pour order 40): 101.6,273.05 121.742,273.05 124.181,270.612 124.181,248.869 120.523,245.212 100.813,245.212 93.726,238.125 74.336,238.125 71.592,240.869 71.592,246.191 85.954,260.553 98.501,260.553 98.501,269.951
GND_HV on Bottom Layer "GND_HV_L02_P044" (solid, pour order 44): 15.316,78.13 15.336,78.15 19.97,78.15 20.447,77.673 20.447,74.549 19.126,73.228 16.561,73.228 15.24,74.549 15.24,78.13
no net on Bottom Overlay "NONET_L02_P-001" (solid): 92.888,48.743 102.464,48.743 102.464,42.824 86.333,26.694 72.868,26.694 72.868,27.579 94.488,49.2
no net on Bottom Overlay "NONET_L02_P-001" (solid): 96.291,226.162 96.317,226.162 102.565,232.41 106.858,232.41 106.858,223.037 104.167,220.346
no net on Bottom Overlay "NONET_L02_P-001" (solid): 88.671,106.096 98.73,106.096 98.806,106.172 98.806,104.75 101.879,100.99 102.514,100.178 102.514,90.881 92.786,90.881 88.544,95.123 88.544,106.223

## Other copper
Top Layer:
  pour cut-out: 35.702,5.359 ccw(c37.287,5.359) 37.287,3.775 ccw(c37.287,5.359) 38.872,5.359 ccw(c37.287,5.359) 37.287,6.944 ccw(c37.287,5.359)
  pour cut-out: 65.547,5.359 ccw(c67.132,5.359) 67.132,3.775 ccw(c67.132,5.359) 68.717,5.359 ccw(c67.132,5.359) 67.132,6.944 ccw(c67.132,5.359)
  pour cut-out: 5.764,146.329 5.764,161.62 81.761,161.62 81.761,146.329
  pour cut-out: 10.439,183.159 10.439,198.45 86.436,198.45 86.436,183.159
  pour cut-out: 7.518,108.687 7.518,123.977 83.515,123.977 83.515,108.687
Bottom Layer:
  pour cut-out: 35.328,13.233 ccw(c37.287,13.233) 37.287,11.274 ccw(c37.287,13.233) 39.247,13.233 ccw(c37.287,13.233) 37.287,15.193 ccw(c37.287,13.233)
  pour cut-out: 64.833,13.233 ccw(c67.132,13.233) 67.132,10.934 ccw(c67.132,13.233) 69.431,13.233 ccw(c67.132,13.233) 67.132,15.533 ccw(c67.132,13.233)
  pour cut-out: 9.146,183.769 9.146,198.196 76.583,198.196 76.583,183.769
  pour cut-out: 7.417,113.386 7.417,127.813 73.226,127.813 73.226,113.386

## Silkscreen, mask and mechanical layers (free items; w line width, h text height)
Top Overlay:
  circle w5: c67.132,5.232 r3.34
  circle w5: c37.287,5.232 r3.34
  circle w0.013: c84.678,25.144 r0.5
  circle w0.013: c82.138,25.144 r0.5
  circle w0.013: c79.598,25.144 r0.5
  circle w0.013: c77.058,25.144 r0.5
  circle w0.013: c74.518,25.144 r0.5
  circle w0.013: c29.054,25.144 r0.5
  circle w0.013: c31.594,25.144 r0.5
  circle w0.013: c34.134,25.144 r0.5
  circle w0.013: c36.674,25.144 r0.5
  circle w0.013: c39.214,25.144 r0.5
  circle w0.013: c41.754,25.144 r0.5
  circle w0.013: c71.978,25.144 r0.5
  lines w0.013: 15.337,-15.856 ccw(c19.337,-15.856) 19.337,-19.856 91.337,-19.856 ccw(c91.337,-15.856) 95.337,-15.856 95.337,24.144 ccw(c91.337,24.144) 91.337,28.144 19.337,28.144 ccw(c19.337,24.144) 15.337,24.144 15.337,-15.856
  text "+VDC" at 100.746,238.414 h6
  text "-" at 55.745,237.132 h6
  text "+VDC2" at 94.878,208.289 h6
  text "GND" at 106.334,96.606 h6
  text "+" at 118.125,21.3 h6
  text "+" at -11.575,20.875 h6
  text "-" at 117.95,11.351 h6
  text "-" at -11.6,11.001 h6
  text "+" at 117.975,1.575 h6
  text "+" at -11.7,0.475 h6
  text "-" at 117.825,-8.999 h6
  text "-" at -11.725,-9.199 h6
Bottom Overlay:
  circle w5: c37.321,13.233 r3.34
  circle w5: c67.132,13.233 r3.34
  lines w0.254: -0.864,67.615 0.279,68.758
  lines w5: 12.903,78.029 12.903,109.728 ; 91.059,105.08 91.059,111.344 91.059,123.72 91.059,131.204 91.262,131.407 91.262,186.195 90.983,186.474 90.983,196.98 90.983,207.68 91.161,207.858 91.161,217.526 99.568,225.933 104.292,225.933 104.14,225.781 104.14,223.85 95.783,215.494 ; 100,45.872 100,91.135
  lines w6: 0.279,68.758 3.632,68.758 12.903,78.029 ; 95.783,48.209 95.783,215.494
Bottom Solder:
  lines w5: 6.731,177.317 80.939,177.317 81.356,177.735 81.356,201.879 79.569,203.666 7,203.666 1.109,203.666 -3.962,208.737 -3.962,224.18 13.73,241.873 13.73,243.508 ; 9.88,3.9 100.101,4.089 ; 20.599,57.506 47.879,57.506 ; 22.454,68.605 22.454,68.634 33.779,79.959 33.807,79.959 ; 27.573,243.635 63.603,243.635 ; 33.705,80.3 33.705,177.317 ; 43.421,36.779 55.638,24.562 55.753,24.562 ; 55.994,5.045 55.994,24.257 ; 77.573,243.635 84.25,243.635 91.846,251.231 119.863,251.231 120.128,251.497 120.128,267.874 103.872,267.874
  text "A" at 1326.95,844.829 h2.5
  text "A" at 1319.372,843.683 h2.5
  text "B" at 1327.111,644.729 h2.5
  text "B" at 1319.533,643.583 h2.5
  text "G" at 1184.36,519.385 h2.5
  text "N" at 1185.971,519.385 h2.5
  text "D" at 1187.582,519.385 h2.5
  text "G" at 1176.781,518.239 h2.5
  text "N" at 1178.392,518.239 h2.5
  text "D" at 1180.003,518.239 h2.5
  text "C" at 1327.111,444.468 h2.5
  text "C" at 1319.533,443.322 h2.5
  text "D" at 1327.111,244.207 h2.5
  text "D" at 1319.533,243.061 h2.5
  text "6" at 1225.077,146.574 h2.5
  text "6" at 1217.498,145.428 h2.5
Mechanical 1:
  drawing of 230 lines, arcs and shapes, not listed